# Altium PCB DIO_8SMA_8MCX_MEZZ.PcbDoc (part 2 of 4)
Units mm, origin at the board's own origin, x right, y up, seen from the top; angles counter-clockwise.
Board outline 143 x 98.9 mm, 4 copper layers (Top Layer, Layer 1, Layer 2, Bottom Layer), stack 1.57 mm thick; 303 components, 168 nets, 944 pads, 487 vias.
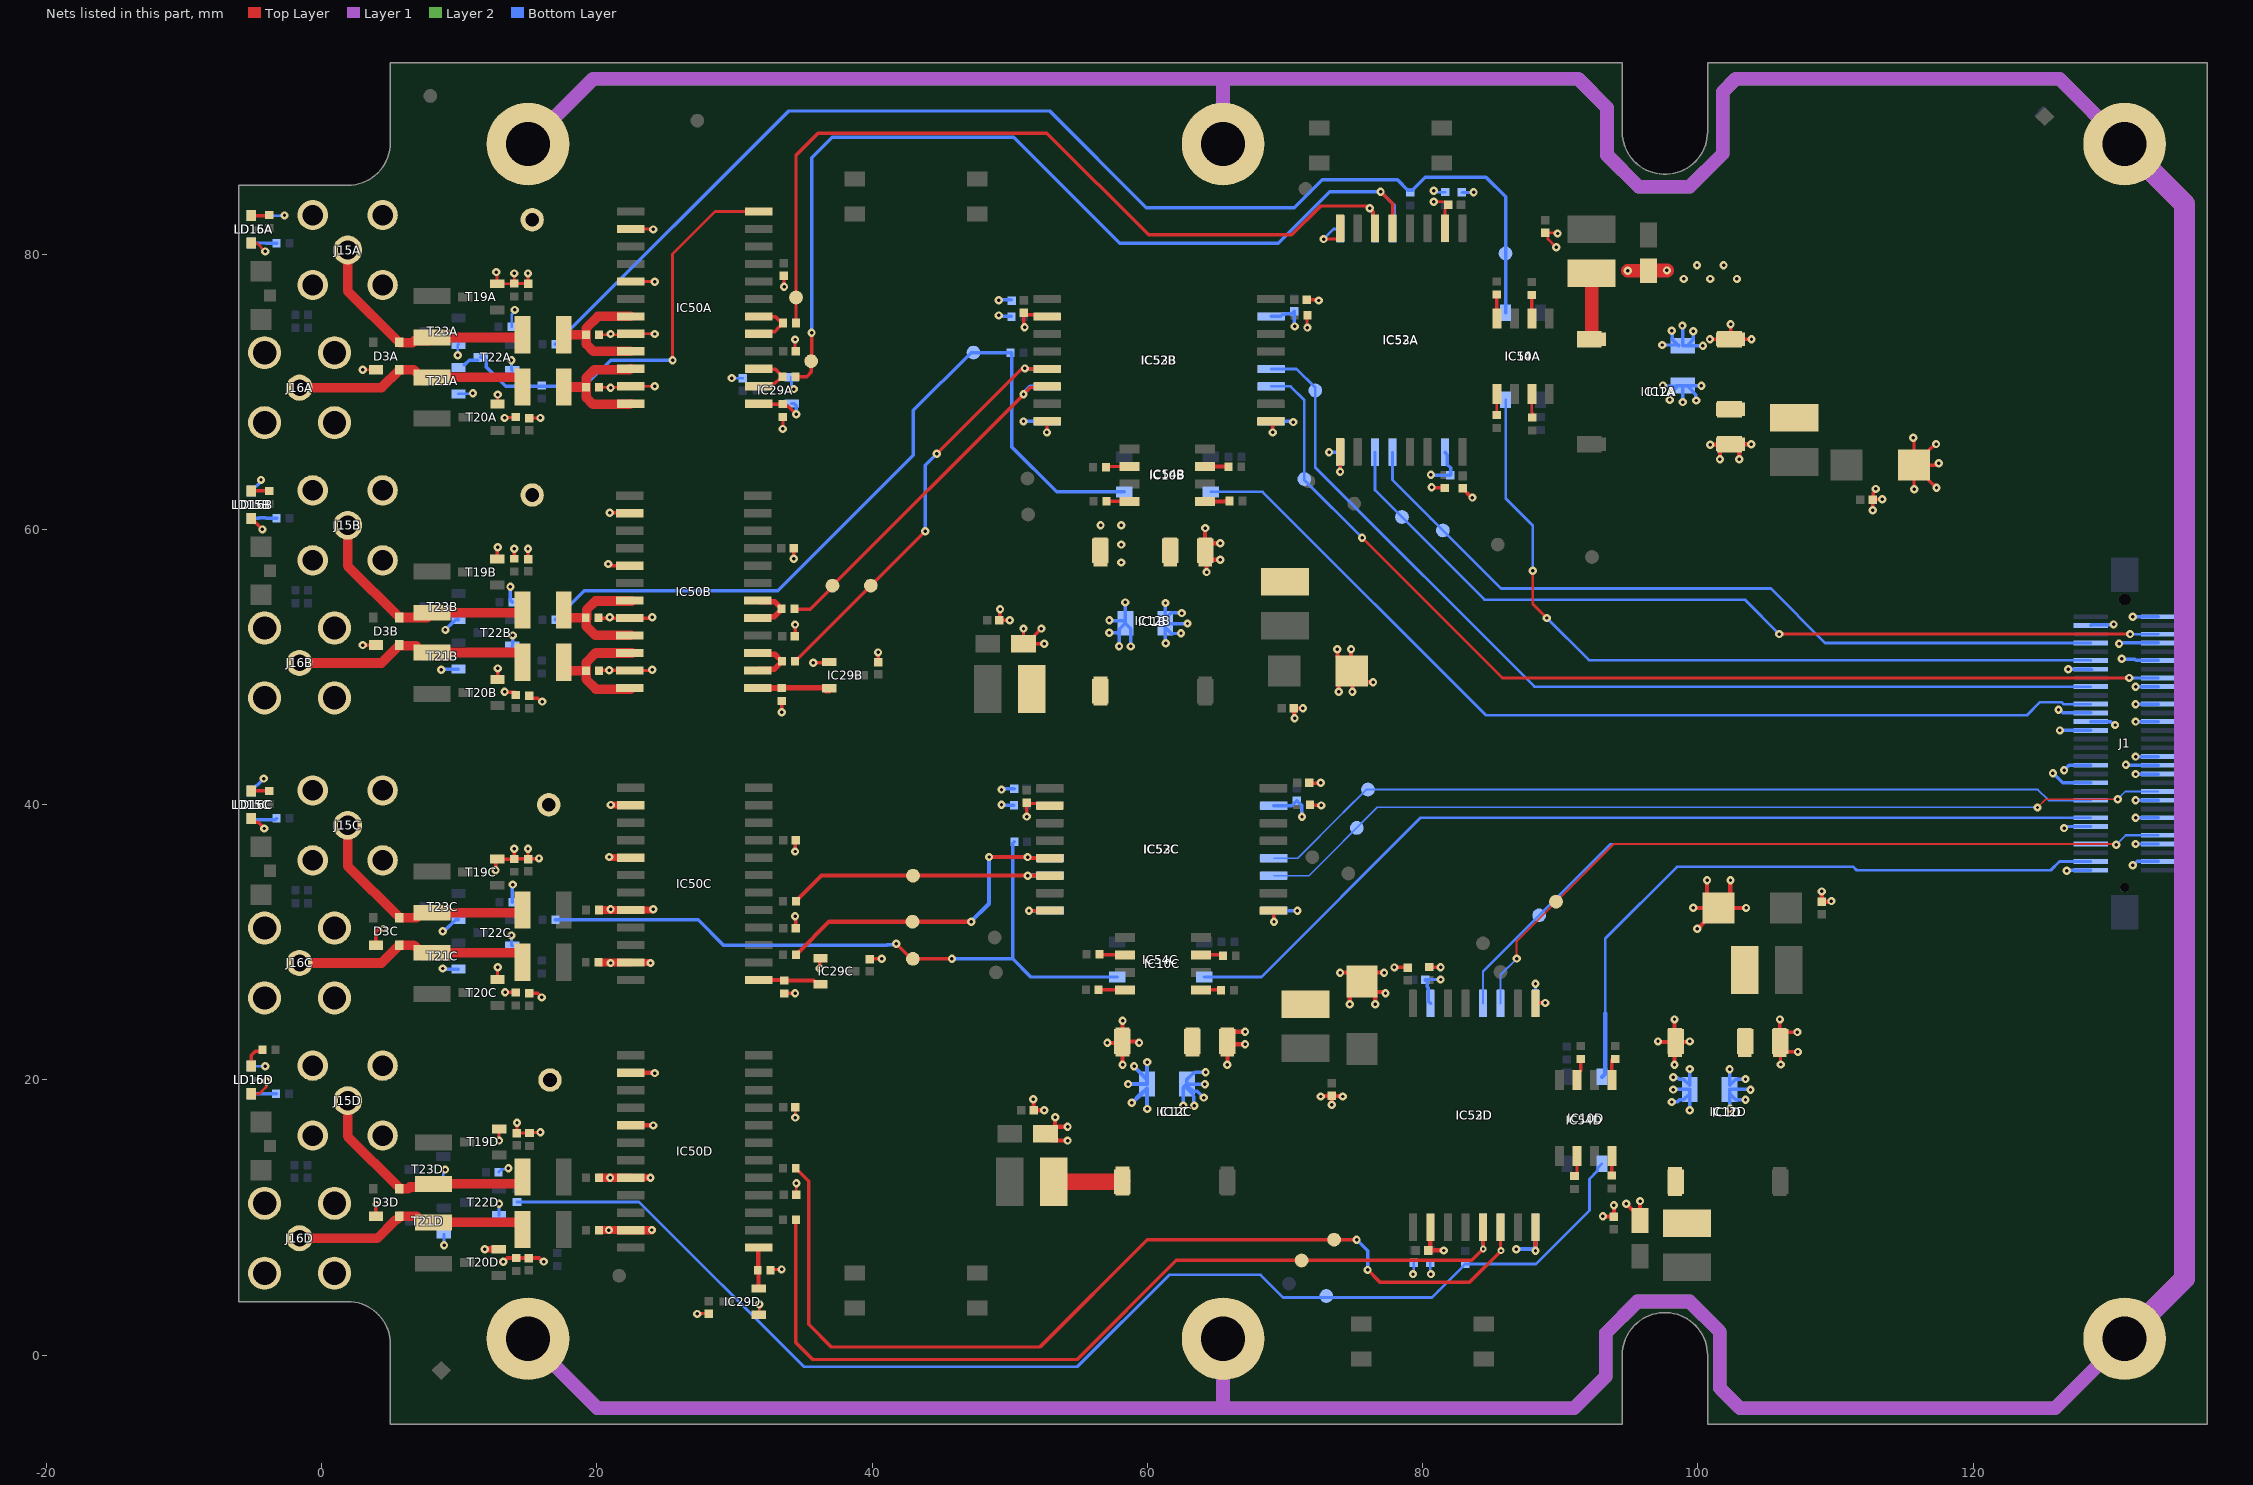
[diagram p4: the nets of this part, all layers, seen from the top]

## Part data
B1A B1B B1C B1D B2A B2B B2C B2D B3A B3B B3C B3D B4A B4B B4C B4D B5A B5B B5C B5D B6A B6B B6C B6D B7A B7B B7C B7D B8A B8B B8C B8D B9A B9B B9C B9D: library part SMD_PAD_D1MM, "Through Hole Pad", Author="CERN DEM JLC", Component Type="Standard (No BOM)", ComponentHeight=0mm, CreateDate=10.10.2017, Family="SMD Pad", HelpURL=Undefined, LatestRevisionDate=10.10.2017, Mounted=No, PackageDescription="1mm Diameter SMD Pad", Part Description="1mm Diameter SMD Pad", Part Number=SMD_PAD_D1MM, Pin Count=1, Sense=No, SMD=No, Socket=No, Status=None
C32A C32B C32C C32D C33A C33B C33C C33D C41A C41B C41C C41D C43A C43B C43C C43D C56A C56B C56C C56D C76A C76B C76C C76D C77A C77B C77C C77D C78A C78B C78C C78D C88A C88B C88C C88D C95A C95B C95C C95D C100A C100B C100C C100D: library part CC0402_100NF_50V_10%_X7R, "Non-polarised capacitor", Case=0402, Manufacturer=GENERIC, Manufacturer1 ComponentHeight=0.55mm, Manufacturer1 Example=MURATA, Manufacturer1 Part Number=GRM155R71H104KE14D, Tolerance=±10%, Voltage=50V, Author="CERN DEM MR", Component Type=Standard, CreateDate=30.06.2017, HelpURL=\\cern.ch\dfs\Applications\Altium\Datasheets\CC0402_MURATA_GRM155R71H104KE14D.pdf, LatestRevisionDate=30.06.2017, Manufacturer Part Number=CC0402_100NF_50V_10%_X7R, Mounted=Yes, Part Description="SMD Multilayer Chip Ceramic Capacitor", Part Number=CC0402_100NF_50V_10%_X7R, Pin Count=2, Sense=No, SMD=Yes, Socket=No, Status=None, TC=X7R
C39A C39B C39C C39D: library part CTE6032-28_1UF_50V_10%, "Polarised capacitor", Case=C, Manufacturer=GENERIC, Manufacturer1 ComponentHeight=2.8mm, Manufacturer1 Example=AVX, Manufacturer1 Part Number=TAJC105K050R, Tolerance=±10%, Voltage=50V, Author="CERN DEM JLC", Component Type=Standard, CreateDate=03.12.2007, HelpURL=\\cern.ch\dfs\Applications\Altium\Datasheets\CTE_AVX_TAJ.pdf, LatestRevisionDate=03.12.2007, Manufacturer Part Number=CTE6032-28_1UF_50V_10%, Mounted=Yes, Part Description="Solid Tantalum Chip Capacitor", Part Number=CTE6032-28_1UF_50V_10%, Pin Count=2, Sense=No, SMD=Yes, Socket=No, Status=Preferred
C42A C42B C42C C42D: library part CTE3216-18_4.7UF_16V_10%_LESR2000, "Polarised capacitor", Case=A, Manufacturer=GENERIC, Manufacturer1 ComponentHeight=1.8mm, Manufacturer1 Example=AVX, Manufacturer1 Part Number=TPSA475K016R2000, Tolerance=±10%, Voltage=16V, Author="CERN DEM JLC", Component Type=Standard, CreateDate=03.09.2012, HelpURL=\\cern.ch\dfs\Applications\Altium\Datasheets\CTE-LESR_AVX_TPS.pdf, LatestRevisionDate=03.09.2012, Manufacturer Part Number=CTE3216-18_4.7UF_16V_10%_LESR2000, Mounted=Yes, Part Description="Low ESR 2R0 Solid Tantalum Chip Capacitor", Part Number=CTE3216-18_4.7UF_16V_10%_LESR2000, Pin Count=2, Sense=No, SMD=Yes, Socket=No, Status=Preferred
D3A D3B D3C D3D: library part CMP-004-00039-1, "D1213A-02SR Series 400 mW Uni-Directional Surface Mount TVS Diode - SOT-143", Case/Package=SOT-143, Max Operating Temperature=150°C, Min Operating Temperature=-65°C, Mounting Technology="Surface Mount", Pins=4
FTG1 FTG5: library part FIDUCIAL_TARGET_C100-200, "Fiducial Target", Author="CERN DEM JLC", Component Type="Standard (No BOM)", ComponentHeight=0mm, CreateDate=09.02.2010, Family=Fiducial, HelpURL=Undefined, LatestRevisionDate=04.04.2012, Mounted=No, PackageDescription="Round Fiducial Target, Top Layer, 1.0mm, Top Solder 2.0mm, Keepout =2.0mm", Part Description="Round Fiducial Target, Top Layer, 1.0mm, Top Solder 2.0mm, Keepout =2.0mm", Part Number=FIDUCIAL_TARGET_C100-200, Pin Count=1, Sense=No, SMD=Yes, Socket=No, Status=None
FTG2 FTG3 FTG4 FTG6: library part FIDUCIAL_TARGET_S100-200, "Fiducial Target", Author="CERN DEM JLC", Component Type="Standard (No BOM)", ComponentHeight=0mm, CreateDate=09.02.2010, Family=Fiducial, HelpURL=Undefined, LatestRevisionDate=04.04.2012, Mounted=No, PackageDescription="Square Fiducial Target, Top Layer, 1.0mm, Top Solder 2.0mm, Keepout =2.0mm", Part Description="Square Fiducial Target, Top Layer, 1.0mm, Top Solder 2.0mm, Keepout =2.0mm", Part Number=FIDUCIAL_TARGET_S100-200, Pin Count=1, Sense=No, SMD=Yes, Socket=No, Status=None
IC1A IC1B IC1C IC1D: library part CMP-019-00162-2, "Dc-Dc Converter, 5V, 0.2A Rohs Compliant: Yes", Isolation Voltage=3kV, Manufacturer="Wurth Elektronik", Max Supply Voltage=13.2V, Output Current=200mA, Height=7.25mm, Length=13.2mm, Manufacturer Part Search=1769205241, Width=11.4mm
IC10A IC10B IC10C IC10D: "Dual Optocoupler", Case=SOIC8, Manufacturer="ON SEMICONDUCTOR", Author="CERN DEM JLC", Bonding=No, Component Type=Standard, ComponentHeight=3.63mm, CreateDate=03.10.2017, Device=MOCD207M, HelpURL=\\cern.ch\dfs\Applications\Altium\Datasheets\MOCD207M.pdf, LatestRevisionDate=03.10.2017, Manufacturer Part Number=MOCD207M, Mounted=Yes, PackageDescription="SOIC, 1.27mm Pitch; 8 Pin, 3.91mm W X 4.88mm L, IPC Medium Density", Part Description="Dual-Channel Phototransistor Output Optocoupler", Part Number=MOCD207M, Pin Count=8, PressFit=No, Sense=No, SMD=Yes, Socket=No
IC12A IC12B IC12C IC12D: library part CMP-019-00163-2, "1W DC/DC-Converter 'ECONOLINE' SMD 2kV unreg; V. In: 12; V. Out: 05; mA. Out: 200", Case/Package=SMD/SMT, Manufacturer="RECOM Power", Max Operating Temperature=100°C, Max Power Dissipation=1W, Max Supply Voltage=13.2V, Min Operating Temperature=-40°C, Output Voltage=5V, Height=6.7mm, Manufacturer Part Number=R1SE-1205/H2-R, Mounting Technology="Surface Mount"
IC29A IC29B IC29C IC29D: library part VMON_MCP810, "3.075V Microcontroller Supervisory Circuit With Push-Pull Output", Case=SOT23, Manufacturer="MICROCHIP TECHNOLOGY", Author=GK, Bonding=No, Component Type=Standard, ComponentHeight=1.12mm, CreateDate=16.06.2011, Device=MCP810T-315I/TT, HelpURL=\\cern.ch\dfs\Applications\Altium\Datasheets\MCP809T-315I-TT.pdf, LatestRevisionDate=16.06.2011, Manufacturer Part Number=MCP810T-315I/TT, Mounted=Yes, PackageDescription="SOT, 0.95mm, pitch; 3 pin,1.30mm W X 2.92mm L X 1.12mm H body, IPC Medium Density", Part Description="3.075V Microcontroller Supervisory Circuit With Push-Pull Output", Part Number=MCP810T-315I/TT, Pin Count=3, PressFit=No, Sense=No, SMD=Yes, Socket=No
IC50A IC50B IC50C IC50D: "25 Ohms Octal Bus Transceiver With 3-State Outputs", Case=SOIC24, Manufacturer="TEXAS INSTRUMENTS", Author="CERN DEM JLC", Bonding=No, Component Type=Standard, ComponentHeight=2.65mm, CreateDate=03.04.2017, Device=SN74ABTH25245DW, HelpURL=\\cern.ch\dfs\Applications\Altium\Datasheets\SN74ABTH25245DW.pdf, LatestRevisionDate=03.04.2017, Manufacturer Part Number=SN74ABTH25245DW, Mounted=Yes, PackageDescription="SOIC 24, Pitch 1.27mm - Body 7.6x15.6mm, IPC Medium Density", Part Description="25 Ohms Octal Bus Transceiver with 3-State Outputs", Part Number=SN74ABTH25245DW, Pin Count=24, PressFit=No, Sense=No, SMD=Yes, Socket=No
IC52A IC52B IC52C IC52D IC53A IC53B IC53C IC53D: library part CMP-015-00012-2, "Highest isolation rating, dual-channel, 2/0, reinforced digital isolator 16-SOIC -55 to 125", Case/Package=SOIC, Manufacturer="Texas Instruments", Max Operating Temperature=125°C, Max Supply Voltage=5.5V, Min Operating Temperature=-55°C, Min Supply Voltage=2.25V, Manufacturer Part Number=ISO7820DWW, Pins=16
IC54A IC54B IC54C IC54D: "Single Optocoupler", Case=SOIC4, Manufacturer=TOSHIBA, Author="CERN DEM JMW", Bonding=No, Component Type=Standard, ComponentHeight=2.3mm, CreateDate=05.10.2015, Device=TLP183, HelpURL=\\cern.ch\dfs\Applications\Altium\Datasheets\TLP183.pdf, LatestRevisionDate=04.09.2017, Manufacturer Part Number=TLP183, Mounted=Yes, PackageDescription="SOIC, 1.27mm Pitch; 4 Pin, TOSHIBA Case (5mm Creepage)", Part Description="Photocoupler InGaAs Infrared LED & Photo-Transistor", Part Number=TLP183, Pin Count=4, PressFit=No, Sense=No, SMD=Yes, Socket=No
J1: library part CMP-002-04666-1, "Header Connector, PCB Mount, RECEPT, 60 Contacts, PIN, 0.025 Pitch, SURFACE MOUNT Term", Case/Package=Metal, Manufacturer=Molex, Manufacturer Part Number=0550910674, Max Operating Temperature=85°C, Min Operating Temperature=-55°C, Mounting Technology="Surface Mount", Number of Rows=2, Pins=60
J15A J15B J15C J15D: library part CMP-002-04652-5, "SMA connector Delock 65848"
J16A J16B J16C J16D: library part AMPHENOL_919-383J-51A, Manufacturer=AMPHENOL, Manufacturer Part Number=919-383J-51A, Author="CERN DEM BC", Component Type=Standard, ComponentHeight=6mm, CreateDate=31.01.2019, Family=MCX, HelpURL=\\cern.ch\dfs\Applications\Altium\Datasheets\AMPHENOL_919-383J-51A.pdf, LatestRevisionDate=31.01.2019, Mounted=Yes, Part Description="50 Ohm, RF Connector, MCX Right Angle PCB Receptacle Jack", Part Number=AMPHENOL_919-383J-51A, Pin Count=5, PressFit=No, Sense=No, SMD=No, Socket=No, Status=None
L5A L5B L5C L5D L11A L11B L11C L11D: library part IND_10UH_10%_MURATA-PS_8400, "Inductor With Core", Manufacturer="MURATA POWER SOLUTIONS", Manufacturer Part Number=84103C, Power=950mA, Resistance=0.24R, Tolerance=±10%, Author="CERN DEM JLC", Component Type=Standard, ComponentHeight=2.9mm, CreateDate=02.07.2012, HelpURL=\\cern.ch\dfs\Applications\Altium\Datasheets\IND_MURATA-PS_8400.pdf, LatestRevisionDate=02.07.2012, Mounted=Yes, Part Description="Miniature Surface Mount Power Inductor (8400 Serie)", Part Number=IND_10UH_10%_MURATA-PS_8400, Pin Count=2, Sense=No, SMD=Yes, Socket=No, Status=None
LD15A LD15B LD15C LD15D LD16A LD16B LD16C LD16D: library part LED_AVAGO_HSME-C120, "LED Green 1C 2A", Manufacturer="AVAGO TECHNOLOGIES", Manufacturer Part Number=HSME-C120, Author="CERN DEM JMW", Bonding=No, Color=Green, Component Type=Standard, ComponentHeight=0.7mm, ComponentLink1Description="Design Guide", ComponentLink1URL=\\cern.ch\dfs\Applications\Altium\Datasheets\LED_AVAGO_HSME-C110_DESIGN-GUIDE.pdf, CreateDate=22.07.2009, HelpURL=\\cern.ch\dfs\Applications\Altium\Datasheets\LED_AVAGO_HSME-C120.pdf, LatestRevisionDate=20.06.2012, Mounted=Yes, PackageDescription="Green Chip LED, 2-Leads, Body 1.7x1.1mm, Side Emitting Package", Part Description="High Performance Right Angle Chip Green LED", Part Number=LED_AVAGO_HSME-C120, Pin Count=2, PressFit=No, Sense=No, SMD=Yes, Socket=No
LD17A LD17B LD17C LD17D: library part CMP-007-00060-1, "Dual Color LED, Hyper Red/super Bright Green, Water Clear, 2mm", Case/Package=SMD/SMT, Forward Voltage=2.2V, Manufacturer=Kingbright, Max Operating Temperature=85°C, Min Operating Temperature=-40°C, Manufacturer Part Number=APBA3010SURKSGC-F01, Mounting Technology="Surface Mount"
LOGO1: library part CMP-00028-00007-2, "ARTIQ logo to place on the PCB"
Logo2: library part CMP-00028-00009-2, "Placeholder for QR code with PN"
M3 M4 M5 M6 M7 M8: library part CMP-00028-00020-1, "Plated Hole for screw 3mm"
R29A R29B R29C R29D R34A R34B R34C R34D R212A R212B R212C R212D R213A R213B R213C R213D R215A R215B R215C R215D R217A R217B R217C R217D R221A R221B R221C R221D: library part R0402_510R_1%_0.0625W_100PPM, "Resistor - 1%", Case=0402, Manufacturer=GENERIC, Manufacturer1 ComponentHeight=0.4mm, Manufacturer1 Example="YAGEO PHYCOMP", Manufacturer1 Part Number=232270675101L, Power=0.0625W, Tolerance=±1%, Author="CERN DEM JLC", Component Type=Standard, CreateDate=03.12.2007, HelpURL=\\cern.ch\dfs\Applications\Altium\Datasheets\R0402_Phycomp_RC0402.pdf, LatestRevisionDate=17.10.2012, Manufacturer Part Number=R0402_510R_1%_0.0625W_100PPM, Mounted=Yes, Part Description="General Purpose Thick Film Chip Resistor", Part Number=R0402_510R_1%_0.0625W_100PPM, Pin Count=2, Sense=No, SMD=Yes, Socket=No, Status="Not recommended", TC=±100ppm/°C
R69A R69B R69C R69D: library part R1206_0R_JUMPER, "Resistor", Case=1206, Manufacturer=GENERIC, Manufacturer1 ComponentHeight=0.65mm, Manufacturer1 Example="NIC COMPONENT", Manufacturer1 Part Number=NRC12Z0, Author="CERN DEM JLC", Component Type=Standard, CreateDate=03.12.2007, HelpURL=\\cern.ch\dfs\Applications\Altium\Datasheets\R1206_NIC_NRC.pdf, LatestRevisionDate=13.03.2008, Manufacturer Part Number=R1206_0R_JUMPER, Mounted=Yes, Part Description="2A (0.05R Max DC Resistance) Zero Ohm Jumper", Part Number=R1206_0R_JUMPER, Pin Count=2, PressFit=No, Sense=No, SMD=Yes, Socket=No, Status=Preferred
R87A R87B R87C R87D R88A R88B R88C R88D R216A R216B R216C R216D: library part R0402_100R_1%_0.1W_100PPM, "Resistor - 1%", Case=0402, Manufacturer=GENERIC, Manufacturer1 ComponentHeight=0.4mm, Manufacturer1 Example=PANASONIC, Manufacturer1 Part Number=ERJ2RKF1000X, Manufacturer Part Number=R0402_100R_1%_0.1W_100PPM_50V, Power=0.1W, Tolerance=±1%, Voltage=50V, Author="CERN DEM JLC", Component Type=Standard, CreateDate=12.12.2013, HelpURL=\\cern.ch\dfs\Applications\Altium\Datasheets\R0402_PANASONIC_ERJ2RK.pdf, LatestRevisionDate=03.03.2015, Mounted=Yes, Part Description="General Purpose Thick Film Chip Resistor", Part Number=R0402_100R_1%_0.1W_100PPM, Pin Count=2, Sense=No, SMD=Yes, Socket=No, Status="Not recommended", TC=±100ppm/°C
R202A R202B R202C R202D: library part R0402_NO-VALUE, "Resistor", Case=0402, Author="CERN DEM JLC", Component Type=Standard, CreateDate=03.12.2007, HelpURL=Undefined, LatestRevisionDate=13.03.2008, Manufacturer=Undefined, Manufacturer1 ComponentHeight=Undefined, Manufacturer1 Example=Undefined, Manufacturer1 Part Number=Undefined, Manufacturer Part Number=R0402_NO-VALUE, Mounted=No, Part Description="Reserved Footprint For a 0402 (1005) Chip Resistor", Part Number=R0402_NO-VALUE, Pin Count=2, PressFit=No, Sense=No, SMD=Yes, Socket=No, Status=None
R203A R203B R203C R203D R208A R208B R208C R208D: library part R1210_30R_5%_0.5W_200PPM, "Resistor - 5%", Case=1210, Manufacturer=VISHAY, Manufacturer Part Number=CRCW121030R0JNEA, Part Number=R1210_30R_5%_0.5W_200ppm, Power=0.5W, Tolerance=±5%, Author="CERN DEM JMW", Component Type=Standard, ComponentHeight=0.6mm, CreateDate=06.08.2014, HelpURL=\\cern.ch\dfs\Applications\Altium\Datasheets\R1210_VISHAY_CRCW1210.pdf, LatestRevisionDate=06.08.2014, Mounted=Yes, Part Description="Thick Film Chip Resistor", Pin Count=2, PressFit=No, Sense=No, SMD=Yes, Socket=No, Status=None, TC=±200ppm/°C
R204A R204B R204C R204D R205A R205B R205C R205D R222A R222B R222C R222D: library part R0402_22R_1%_0.0625W_100PPM, "Resistor - 1%", Case=0402, Manufacturer=GENERIC, Manufacturer1 ComponentHeight=0.4mm, Manufacturer1 Example="YAGEO PHYCOMP", Manufacturer1 Part Number=232270672209L, Power=0.0625W, Tolerance=±1%, Author="CERN DEM JLC", Component Type=Standard, CreateDate=03.12.2007, HelpURL=\\cern.ch\dfs\Applications\Altium\Datasheets\R0402_Phycomp_RC0402.pdf, LatestRevisionDate=17.10.2012, Manufacturer Part Number=R0402_22R_1%_0.0625W_100PPM, Mounted=Yes, Part Description="General Purpose Thick Film Chip Resistor", Part Number=R0402_22R_1%_0.0625W_100PPM, Pin Count=2, PressFit=No, Sense=No, SMD=Yes, Socket=No, Status="Not Recommended", TC=±100ppm/°C
R206A R206B R206C R206D R210A R210B R210C R210D R218A R218B R218C R218D R219A R219B R219C R219D R220A R220B R220C R220D R223A R223B R223C R223D: library part R0402_10K_1%_0.0625W_100PPM, "Resistor - 1%", Case=0402, Manufacturer=GENERIC, Manufacturer1 ComponentHeight=0.4mm, Manufacturer1 Example="YAGEO PHYCOMP", Manufacturer1 Part Number=232270671003L, Power=0.0625W, Tolerance=±1%, Author="CERN DEM JLC", Component Type=Standard, CreateDate=03.12.2007, HelpURL=\\cern.ch\dfs\Applications\Altium\Datasheets\R0402_Phycomp_RC0402.pdf, LatestRevisionDate=17.10.2012, Manufacturer Part Number=R0402_10K_1%_0.0625W_100PPM, Mounted=Yes, Part Description="General Purpose Thick Film Chip Resistor", Part Number=R0402_10K_1%_0.0625W_100PPM, Pin Count=2, Sense=No, SMD=Yes, Socket=No, Status="Not recommended", TC=±100ppm/°C
R207A R207B R207C R207D R211A R211B R211C R211D: library part R1210_49R9_1%_0.5W_100PPM_VISHAY_CRCW, "Resistor - 1%", Case=1210, Manufacturer="VISHAY DRALORIC", Manufacturer Part Number=CRCW121049R9FKTA, Power=0.5W, Tolerance=±1%, Author="CERN DEM JMW", Component Type=Standard, ComponentHeight=0.6mm, CreateDate=06.08.2014, HelpURL=\\cern.ch\dfs\Applications\Altium\Datasheets\R1210_VISHAY_CRCW1210.pdf, LatestRevisionDate=06.08.2014, Mounted=Yes, Part Description="Thick Film Chip Resistor", Part Number=R1210_49R9_1%_0.5W_100PPM_VISHAY_CRCW, Pin Count=2, Sense=No, SMD=Yes, Socket=No, Status=None, TC=±100ppm/°C
R209A R209B R209C R209D R214A R214B R214C R214D: library part R0402_0R_JUMPER, "Resistor", Case=0402, Manufacturer=GENERIC, Manufacturer1 ComponentHeight=0.4mm, Manufacturer1 Example="YAGEO PHYCOMP", Manufacturer1 Part Number=232270591001L, Author="CERN DEM JLC", Component Type=Standard, CreateDate=03.12.2007, HelpURL=\\cern.ch\dfs\Applications\Altium\Datasheets\R0402_Phycomp_RC0402.pdf, LatestRevisionDate=17.10.2012, Manufacturer Part Number=R0402_0R_JUMPER, Mounted=Yes, Part Description="1A (0.05R Max DC Resistance) Zero Ohm Jumper", Part Number=R0402_0R_JUMPER, Pin Count=2, PressFit=No, Sense=No, SMD=Yes, Socket=No, Status="Not Recommended"
SW5A SW5B SW5C SW5D: library part SW_OMRON_A6S-2102-H, "2 Ways SPST DIP Switch", Manufacturer=OMRON, Manufacturer Part Number=A6S-2102-H, Author="CERN DEM JMW", Component Type=Standard, ComponentHeight=3.8mm, CreateDate=25.09.2008, Family=Switch, HelpURL=\\cern.ch\dfs\Applications\Altium\Datasheets\SW_OMRON_A6S-2102-H.pdf, LatestRevisionDate=25.09.2008, Mounted=Yes, PackageDescription="Pitch 2.54mm, Body 6.2x6.4mm, 2 Ways SPST Surface-Mounting DIP Switch, OMRON A6S-H", Part Description="2 Ways SPST DIP Switch, White Flat Actuator with Seal Tape, Contact Rating 25mA 24VDC", Part Number=SW_OMRON_A6S-2102-H, Pin Count=4, PressFit=No, Sense=No, SMD=Yes, Socket=No, Status=None
T19A T19B T19C T19D T20A T20B T20C T20D T21A T21B T21C T21D T22A T22B T22C T22D T23A T23B T23C T23D: "N-CHANNEL MOSFET WITH DIODE", Case=SOT23-3, Manufacturer="ON SEMICONDUCTOR", Author="CERN DEM JLC", Bonding=No, Component Type=Standard, ComponentHeight=1.11mm, CreateDate=23.03.2009, Device=BSS138LT1G, HelpURL=\\cern.ch\dfs\Applications\Altium\Datasheets\BSS138LT1G.pdf, LatestRevisionDate=23.03.2009, Manufacturer Part Number=BSS138LT1G, Mounted=Yes, PackageDescription="SOT23 3-Leads, Pitch 0.95mm - Body 1.4x3mm, IPC Medium Density", Part Description="50V 200mA N-Channel Enhancement Mode Field-Effect Transistor", Part Number=BSS138LT1G, Pin Count=3, PressFit=No, Sense=No, SMD=Yes, Socket=No
TP1A TP1B TP1C TP1D: library part PLATED_HOLE1.0_PAD1.5, "Single Terminal Socket", Author="CERN DEM JLC", Component Type="Standard (No BOM)", ComponentHeight=0mm, CreateDate=30/10/2008, Family="Plated Hole", HelpURL=Undefined, LatestRevisionDate=30/10/2008, Mounted=No, PackageDescription="Plated Through Hole: Hole Dia.=1mm Pad Dia.=1.5mm,  IPC-7251 Level C", Part Description="Plated Through Hole: Hole Dia.=1mm Pad Dia.=1.5mm,  IPC-7251 Level C", Part Number=PLATED_HOLE1.0_PAD1.5, Pin Count=1, Sense=No, SMD=No, Socket=No, Status=None

## Via types
v1: diameter 0.6, hole 0.25, Top Layer to Bottom Layer, tented both sides, 472 vias
v2: diameter 0.5, hole 0.25, Top Layer to Bottom Layer, tented both sides, 8 vias
v3: diameter 0.5, hole 0.2, Top Layer to Bottom Layer, tented both sides, 7 vias

## Nets (pads, with @x,y where several pads share a name; then routed paths per layer and width w, separated by ;. In a path a pad name is that pad's centre, name@x,y a point inside that pad or via, vN(x,y) a via of type N, cw(c..) or ccw(c..) an arc to the next point about the centre after c; other vN are vias at no path point)
CHASSIS: M3.1 M4.1 M5.1 M6.1 M7.1 M8.1 | length 633.8
  Layer 1 w1: M6.1@15,1.2 20.05,-3.85 65.5,-3.85 ; M7.1@15,88 19.75,92.75 65.5,92.75 ; M8.1@65.5,1.2 65.5,-3.85 ; M4.1@65.5,88 65.5,92.75 ; M3.1@131,1.2 125.95,-3.85 103.067,-3.85 101.584,-2.367 101.584,1.716 99.4,3.9 95.6,3.9 93.3,1.6 93.3,-1.542 90.992,-3.85 65.5,-3.85 ; M5.1@131,88 126.25,92.75 102.767,92.75 101.8,91.783 101.8,87.3 99.4,84.9 95.7,84.9 93.4,87.2 93.4,90.642 91.292,92.75 65.5,92.75
  Layer 1 w1.5: M3.1@131,1.2 135.35,5.55 135.35,83.65 M5.1@131,88
  Layer 2 w1: M6.1@15,1.2 20.05,-3.85 65.5,-3.85 ; M7.1@15,88 19.75,92.75 65.5,92.75 ; M8.1@65.5,1.2 65.5,-3.85 ; M4.1@65.5,88 65.5,92.75 ; M3.1@131,1.2 125.95,-3.85 103.067,-3.85 101.584,-2.367 101.584,1.716 99.4,3.9 95.6,3.9 93.3,1.6 93.3,-1.542 90.992,-3.85 65.5,-3.85 ; M5.1@131,88 126.25,92.75 102.767,92.75 101.8,91.783 101.8,87.3 99.4,84.9 95.7,84.9 93.4,87.2 93.4,90.642 91.292,92.75 65.5,92.75
DIR_CTRL5: IC54A.3 J1.11 | length 57.9
  Top Layer w0.2: v1(88,57) 88,54.582 v1(89.018,53.564)
  Bottom Layer w0.2: IC54A.3@86.038,69.426 86.038,62.24 88,60.278 v1(88,57) ; v1(89.018,53.564) 92.082,50.5 128.532,50.5 J1.11@128.55,50.482
DIR_CTRL6: IC54B.3 J1.21 | length 71.1
  Bottom Layer w0.2: IC54B.3@64.618,62.73 68.37,62.73 84.6,46.5 123.9,46.5 124.85,47.45 126.428,47.45 126.57,47.307 J1.21@128.55,47.307
DIR_CTRL7: IC54C.3 J1.47 | length 69.2
  Bottom Layer w0.2: IC54C.3@64.118,27.48 68.28,27.48 79.852,39.052 J1.47@128.55,39.052
DIR_CTRL8: IC54D.3 J1.57 | length 48
  Bottom Layer w0.2: 93.27,24.83 93.27,30.27 98.486,35.486 111.291,35.486 111.541,35.237 125.637,35.237 126.277,35.877 J1.57@128.55,35.877
  Bottom Layer w0.3: IC54D.3@93.02,20.218 93.27,20.468 93.27,24.83
GND: C39A.2 C39B.2 C39C.2 C39D.2 C41A.1 C41B.1 C41C.1 C41D.1 C77A.1 C77B.1 C77C.1 C77D.1 C78A.1 C78B.1 C78C.1 C78D.1 IC1A.1 IC1B.1 IC1C.1 IC1D.1 IC12A.1 IC12B.1 IC12C.1 IC12D.1 IC52A.9 IC52B.9 IC52C.9 IC52D.9 IC53A.2 IC53A.8 IC53B.2 IC53B.8 IC53C.2 IC53C.8 IC53D.2 IC53D.8 J1.2 J1.3 J1.8 J1.12 J1.13 J1.18 J1.22 J1.23 J1.25 J1.26 J1.27 J1.34 J1.35 J1.36 J1.38 J1.39 J1.44 J1.48 J1.49 J1.54 J1.58 J1.59 R69A.1 R69B.1 R69C.1 R69D.1 R209A.2 R209B.2 R209C.2 R209D.2 | length 168.3
  Top Layer w0.25: IC52B.9@68.958,67.855 69.1,67.713 v1(69.1,67.05) ; IC52C.9@69.158,32.305 69.171,32.293 69.171,31.529 v1(69.2,31.5) ; C77B.1@71.583,76.7 71.608,76.675 72.416,76.675 v1(72.456,76.635) ; R209B.2@71.597,75.492 71.598,75.49 71.598,74.696 v1(71.627,74.668) ; C77C.1@71.802,41.561 v1@72.569,41.561 ; R209C.2@71.818,39.963 72.622,39.963 v1(72.638,39.947) ; v1(74,64.2) 74.003,64.203 74.003,65.639 IC52A.9@74.005,65.642 ; v1@77.954,28.183 C77D.1@78.981,28.183 ; 78.32,28.18 78.322,28.183 ; R209D.2@80.558,28.197 80.56,28.198 81.298,28.198 v1(81.3,28.2) ; v1(80.647,63.066) 80.691,63.023 81.622,63.023 R209A.2@81.641,63.003 ; C77A.1@82.85,63.017 83.549,62.318 v1(83.619,62.318) ; IC52D.9@88.195,25.558 88.236,25.6 v1(88.9,25.6) ; v1(105.958,24.399) 105.949,24.389 IC1D.1@105.949,23.104 ; IC1D.1@106,22.411 IC1D.1@106,22.36 ; v1(106.025,21.127) 106,21.152 IC1D.1@106,22.36 ; v1(107.229,23.479) 106.324,23.479 IC1D.1@105.949,23.104 ; v1(107.267,22.036) 106.324,22.036 IC1D.1@106,22.36 ; v1(112.7,61.4) C41A.1@112.699,62.17 C41A.1@112.714,62.185 ; v1(112.922,62.945) 112.922,62.85 112.725,62.653 112.725,62.196 C41A.1@112.714,62.185 ; v1(113.4,62.2) 113.385,62.185 C41A.1@112.714,62.185 ; v1(115.643,66.67) 115.699,66.614 C39A.2@115.699,64.67 ; v1(115.724,62.92) 115.699,62.945 C39A.2@115.699,64.67 ; v1(117.3,66.2) 117.229,66.2 116.749,65.72 116.749,65.67 C39A.2@115.749,64.67 ; v1(117.334,63.027) 117.334,63.035 116.749,63.62 116.749,63.67 C39A.2@115.749,64.67 ; v1(117.5,64.8) 117.405,64.8 117.275,64.67 C39A.2@115.749,64.67 ; IC1D.1@105.949,23.104 IC1D.1@105.949,22.711 105.949,22.411 IC1D.1@106,22.36 ; C39A.2@115.699,64.67 C39A.2@115.749,64.67
  Top Layer w0.3: v1(64.2,60.1) 64.2,58.46 IC12B.1@64.21,58.45 ; IC1B.1@64.21,58.55 64.66,59 v1(65.3,59) ; v1(64.3,56.9) IC1B.1@64.3,58.16 ; v1(65.3,57.8) 64.66,57.8 IC1B.1@64.3,58.16 ; v1(65.8,21.1) 65.81,21.11 IC1C.1@65.81,22.75 65.96,22.6 v1(67.1,22.6) ; IC1C.1@65.81,23.15 66.16,23.5 v1(67.1,23.5) ; v1(70.693,46.281) 70.671,46.302 70.671,46.979 C41B.1@70.65,47 v1(71.3,47) ; v1(72.6,18.8) 72.625,18.825 73.375,18.825 C41C.1@73.4,18.85 ; v1(73.4,18.2) C41C.1@73.4,18.85 ; v1(73.8,51.3) 73.811,51.289 73.811,50.739 73.825,50.725 73.825,50.675 74.8,49.7 C39B.2@74.85,49.7 ; v1(73.9,48.2) 73.9,48.75 C39B.2@74.85,49.7 ; v1(74,27.8) 74.95,27.8 C39C.2@75.6,27.15 ; v1(74.2,18.8) 74.175,18.825 73.425,18.825 C41C.1@73.4,18.85 ; v1(74.7,25.5) 74.7,26.25 C39C.2@75.6,27.15 ; v1(74.8,51.3) 74.8,49.75 C39B.2@74.85,49.7 ; v1(74.9,48.2) C39B.2@74.9,49.65 ; v1(76.4,48.9) 75.65,48.9 C39B.2@74.9,49.65 ; v1(76.559,25.495) 76.559,26.191 76.361,26.389 77.13,26.389 77.219,26.3 v1(77.3,26.3) ; v1(77.2,27.8) 76.25,27.8 C39C.2@75.6,27.15 ; v1@99.65,32.5 C39D.2@101.45,32.5 ; v1(99.958,30.987) 99.987,30.987 100.475,31.475 100.475,31.525 C39D.2@101.45,32.5 ; v1@100.65,34.5 100.65,33.35 C39D.2@101.5,32.5 ; v1(100.888,66.152) IC1A.1@102.011,66.152 ; v1(101.6,65.1) 101.6,65.74 IC1A.1@102.012,66.152 ; IC1A.1@102.05,66.114 IC1A.1@102.012,66.152 ; IC12A.1@102.3,66.19 102.05,66.19 IC1A.1@102.012,66.152 ; v1@102.35,34.5 102.35,33.35 C39D.2@101.5,32.5 ; v1(103,65.1) 103,65.74 102.55,66.19 103.878,66.19 v1(103.879,66.191) ; v1(103.5,32.5) C39D.2@101.5,32.5 ; v1(109,33.7) C41D.1@109,32.95 109.65,32.95 v1(109.7,33) ; IC12B.1@64.21,58.45 64.3,58.36 IC1B.1@64.3,58.16 ; IC12B.1@64.21,58.45 IC1B.1@64.21,58.35 64.21,58.25 IC1B.1@64.3,58.16 ; C39B.2@74.85,49.7 C39B.2@74.9,49.65 ; C39D.2@101.45,32.5 C39D.2@101.5,32.5
  Bottom Layer w0.25: R69B.1@61.299,52.889 61.749,52.439 62.427,52.439 v1(62.441,52.452) ; R69B.1@61.299,53.191 61.301,53.189 61.301,51.76 v1(61.328,51.733) ; v1(61.315,54.657) 61.299,54.641 61.299,53.494 61.749,53.944 62.482,53.944 v1(62.502,53.924) ; R69B.1@61.339,53.15 62.902,53.15 v1(62.916,53.164) ; v1(62.614,18.12) 62.614,19.452 R69C.1@62.875,19.713 ; R69C.1@62.875,19.388 63.325,18.938 63.325,18.829 63.362,18.792 63.362,18.171 v1(63.401,18.132) ; v1(64.088,18.722) 63.628,19.182 63.325,19.182 62.875,19.632 R69C.1@62.875,19.713 ; v1(64.183,19.683) 62.904,19.683 R69C.1@62.875,19.713 ; v1(64.225,20.566) 63.471,20.566 63.393,20.488 63.325,20.488 62.875,20.038 R69C.1@62.875,19.713 ; IC53B.8@68.992,67.855 70.545,67.855 v1(70.6,67.8) ; IC53B.2@68.992,75.475 69.692,75.475 69.867,75.65 69.99,75.65 70.014,75.674 70.491,75.674 C78B.1@70.667,75.85 70.667,74.783 v1(70.7,74.75) ; IC53C.8@69.192,32.305 69.198,32.3 v1(70.9,32.3) ; IC53C.2@69.192,39.925 70.492,39.925 C78C.1@70.867,40.3 71.2,39.968 71.2,39.153 v1(71.234,39.118) ; v1(73.2,65.6) 73.998,65.6 IC53A.8@74.005,65.608 ; IC53D.2@80.575,25.558 80.407,25.726 80.407,26.693 80.341,26.759 80.341,27.126 C78D.1@80.2,27.267 80.232,27.3 v1(81.3,27.3) ; v1(80.603,63.965) 80.616,63.953 82.02,63.953 82.038,63.97 82.038,64.471 81.8,64.709 81.8,65.433 IC53A.2@81.625,65.608 ; IC53D.8@88.195,25.558 88.197,25.561 88.197,26.997 v1(88.2,27) ; v1(97.455,70.463) 97.494,70.424 R69A.1@98.597,70.424 ; v1(97.956,69.408) 97.965,69.416 97.965,69.854 98.111,70 98.125,70 98.476,70.351 98.476,70.45 R69A.1@98.9,70.45 ; v1(98.895,69.251) 98.9,69.256 R69A.1@98.9,70.45 ; v1(99.874,69.367) 99.852,69.389 99.852,69.8 99.675,69.978 99.675,70 99.225,70.45 R69A.1@99.203,70.45 ; v1(100.253,70.437) 99.215,70.437 R69A.1@99.203,70.45 ; v1(102.299,20.788) 102.301,20.785 102.301,19.618 102.751,20.068 103.456,20.068 v1(103.458,20.066) ; v1(102.327,17.904) 102.301,17.93 R69D.1@102.301,19.012 ; v1(103.458,18.56) 103.455,18.562 102.751,18.562 R69D.1@102.301,19.012 ; v1(103.819,19.282) 103.786,19.315 R69D.1@102.301,19.315 R69D.1@102.301,19.012 ; v1(125.791,42.282) 125.818,42.282 126.507,41.593 J1.39@128.55,41.593 ; v1(126.2,46.9) 126.294,46.9 126.521,46.672 J1.23@128.55,46.672 ; v1(126.3,45.4) 126.302,45.402 J1.27@128.55,45.402 ; v1(126.6,38.3) 126.695,38.3 126.812,38.417 J1.49@128.55,38.417 ; v1(126.6,42.5) 126.963,42.862 J1.35@128.55,42.862 ; v1(126.8,35.2) 126.842,35.242 J1.59@128.55,35.242 ; v1(126.9,49.847) J1.13@128.55,49.847 J1.13@128.6,49.798 ; J1.25@128.55,46.038 128.566,46.022 129.99,46.022 130.219,45.793 v1(130.311,45.793) ; J1.3@128.55,53.023 128.587,53.06 130.16,53.06 v1(130.197,53.097) ; v1(130.6,51.7) 130.652,51.752 J1.8@133.45,51.752 ; v1(130.8,50.6) 130.825,50.575 131.738,50.575 131.831,50.482 J1.12@133.45,50.482 ; v1(131.1,42.9) 131.119,42.881 133.431,42.881 J1.36@133.45,42.862 ; v1(131.593,53.655) 131.596,53.657 J1.2@133.45,53.657 ; v1(131.6,35.6) 131.631,35.6 131.908,35.877 J1.58@133.45,35.877 ; v1(131.8,37.148) J1.54@133.45,37.148 ; v1(131.8,39.052) J1.48@133.45,39.052 ; v1(131.8,40.322) J1.44@133.45,40.322 ; v1(131.8,42.227) J1.38@133.45,42.227 ; v1(131.8,43.497) J1.34@133.45,43.497 ; v1(131.8,46.038) J1.26@133.45,46.038 ; v1(131.8,47.307) J1.22@133.45,47.307 ; v1(131.8,48.578) J1.18@133.45,48.578 ; R69A.1@98.9,70.45 R69A.1@99.203,70.45
  other v1: 77.952,28.18 99.666,32.509 100.666,34.509 102.366,34.509 72.6,41.592
GND_ISOA: C32A.1 C33A.1 C42A.2 C43A.1 C56A.1 C76A.1 C88A.1 C95A.1 C100A.1 D3A.1 IC1A.4 IC12A.4 IC29A.1 IC50A.2 IC50A.5 IC50A.8 IC50A.11 IC52A.2 IC52A.8 IC53A.9 J15A.2 J16A.2 LD15A.1 LD16A.1 R69A.2 R202A.1 R206A.1 R210A.1 R214A.1 R218A.2 R219A.2 R223A.1 T19A.2 T20A.2 T21A.2 T22A.2 T23A.2 TP1A.1 | length 55.3
  Top Layer w0.2: LD16A.1@-5.1,80.8 -4.7,80.8 v1(-4.1,80.2) ; v1(3,71.6) D3A.1@3.95,71.6 ; v1(12.7,78.7) 12.75,78.65 T19A.2@12.75,77.85 13.98,77.85 R219A.2@14,77.87 ; T20A.2@12.783,69.1 12.8,69.118 v1(12.8,69.8) ; v1(13.3,68.1) 13.327,68.127 14.072,68.127 R218A.2@14.099,68.154 ; v1(14,78.6) R219A.2@14,77.87 ; v1(15,78.6) C95A.1@15,77.85 14.98,77.87 R219A.2@14,77.87 ; C100A.1@15.093,68.096 15.896,68.096 v1(15.9,68.1) ; R210A.1@20.17,70.335 22.385,70.335 IC50A.11@22.45,70.4 v1(24.2,70.4) ; R206A.1@20.17,74.145 22.385,74.145 IC50A.8@22.45,74.21 24.19,74.21 v1(24.2,74.2) ; IC50A.5@22.45,78.02 24.18,78.02 v1(24.2,78) ; IC50A.2@22.45,81.83 24.07,81.83 v1(24.1,81.8) ; v1(33.5,67.3) 33.518,67.318 R202A.1@33.518,68.169 ; v1(33.605,77.627) C32A.1@33.605,78.404 ; C33A.1@34.4,73 v1(34.4,73.8) ; v1(72.8,81.1) 73.805,81.1 74.005,81.3 IC52A.8@74.005,81.892 ; v1(80.8,83.8) 81.573,83.8 81.596,83.777 81.69,83.777 81.9,83.567 81.625,83.292 IC52A.2@81.625,81.892 ; v1(89.7,80.5) 89.097,81.103 89.097,81.353 C43A.1@88.9,81.55 89.75,81.55 v1(89.8,81.5)
  Top Layer w0.25: v1(100.87,73.822) IC1A.4@102.042,73.822 ; IC1A.4@102.374,73.736 IC12A.4@102.3,73.81 IC1A.4@102.307,73.817 ; v1(102.374,74.912) 102.374,73.884 IC1A.4@102.307,73.817 ; v1(103.892,73.817) IC1A.4@102.307,73.817
  Top Layer w1: v1(94.9,78.8) C42A.2@96.4,78.8 96.419,78.819 v1(97.745,78.819)
  Bottom Layer w0.2: LD15A.1@-5.1,82.8 -2.707,82.8 v1(-2.691,82.816) ; v1(9.887,72.663) 9.887,73.387 T23A.2@9.95,73.45 ; T21A.2@9.95,69.85 10.95,69.85 v1(11,69.9) ; v1(13.8,72.3) 13.8,71.6 T22A.2@13.85,71.55 ; R223A.1@13.826,74.744 13.826,75.633 14.039,75.846 v1(14.039,75.95) ; v1(29.8,71) 29.809,70.991 C56A.1@30.591,70.991 ; IC29A.1@34.15,71.05 34.15,70.458 34.3,70.308 v1(34.3,70.2) ; v1@72.714,81.014 v1(72.8,81.1) 73.522,81.822 73.97,81.822 IC53A.9@74.005,81.858 ; v1(80.8,84.6) 80.908,84.6 81.006,84.503 R214A.1@81.65,84.503 ; C88A.1@82.85,84.483 83.683,84.483 v1(83.7,84.5)
  Bottom Layer w0.25: v1(97.4,73.4) R69A.2@98.547,73.4 ; v1(98.091,74.444) 98.147,74.387 98.147,73.8 R69A.2@98.547,73.4 ; R69A.2@98.597,73.35 R69A.2@98.547,73.4 ; R69A.2@98.597,73.4 R69A.2@98.547,73.4 ; v1(98.875,74.814) 98.9,74.789 R69A.2@98.9,73.35 R69A.2@99.225,73.35 ; v1(99.666,74.405) 99.685,74.387 99.685,74.19 99.675,74.18 99.675,73.8 R69A.2@99.225,73.35 ; v1(100.366,73.342) 100.358,73.35 R69A.2@99.225,73.35
  other v1: 21,70.3 21,74.2 98.967,78.2 100.9,78.2 102.833,78.2 99.933,79.2 101.867,79.2
GND_ISOB: C32B.1 C33B.1 C42B.2 C43B.1 C56B.1 C76B.1 C88B.1 C95B.1 C100B.1 D3B.1 IC1B.4 IC12B.4 IC29B.1 IC50B.2 IC50B.5 IC50B.8 IC50B.11 IC52B.2 IC52B.8 IC53B.9 J15B.2 J16B.2 LD15B.1 LD16B.1 R69B.2 R202B.1 R206B.1 R210B.1 R214B.1 R218B.2 R219B.2 R223B.1 T19B.2 T20B.2 T21B.2 T22B.2 T23B.2 TP1B.1 | length 48.7
  Top Layer w0.25: LD16B.1@-5.1,60.8 v1(-4.3,60) ; v1(3,51.6) D3B.1@3.95,51.6 ; T19B.2@12.75,57.85 T19B.2@12.75,57.85 12.751,58.651 v1(12.8,58.7) ; T20B.2@12.783,49.1 12.8,49.118 v1(12.8,49.9) ; v1(13.3,48.2) 13.323,48.177 14.076,48.177 R218B.2@14.099,48.154 ; R219B.2@14,57.87 v1(14,58.6) ; C95B.1@15,57.85 v1(15,58.6) ; C100B.1@15.094,47.911 15.275,47.73 15.719,47.73 15.953,47.496 v1(16.041,47.496) ; R210B.1@20.102,49.751 20.111,49.76 20.885,49.76 20.905,49.78 22.351,49.78 IC50B.11@22.381,49.75 23.966,49.75 v1(24.031,49.815) ; R206B.1@20.101,53.56 IC50B.8@22.381,53.56 23.976,53.56 v1(24.031,53.615) ; v1(20.831,57.487) 20.926,57.487 21.043,57.37 IC50B.5@22.381,57.37 ; v1(20.931,61.215) 20.948,61.197 22.364,61.197 IC50B.2@22.381,61.18 ; v1(33.431,46.715) R202B.1@33.431,47.545 ; v1(34.316,57.871) 34.311,57.876 34.311,58.601 C32B.1@34.316,58.605 ; C33B.1@34.381,52.286 34.406,52.311 v1(34.407,53.086) ; v1(35.731,50.315) 36.831,50.315 IC29B.1@36.881,50.365 ; C56B.1@40.431,50.265 v1(40.431,51.065) ; v1(49.3,54.2) 49.275,54.175 49.275,53.425 C43B.1@49.25,53.4 v1(50,53.4) ; v1(51,52.8) C42B.2@51,51.7 ; v1(51.077,74.681) 51.033,74.725 51.033,75.75 51.173,75.61 52.573,75.61 IC52B.2@52.708,75.475 ; v1(52.3,52.8) 51.775,52.275 51.775,52.2 51.275,51.7 C42B.2@51,51.7 ; v1(52.5,51.7) C42B.2@51,51.7 ; v1(52.7,67.05) 52.708,67.058 IC52B.8@52.708,67.855
  Bottom Layer w0.25: LD15B.1@-5.1,62.8 -4.467,63.433 -4.467,63.533 v1(-4.4,63.6) ; v1(8.7,49.8) 8.75,49.85 T21B.2@9.95,49.85 ; v1(9,52.7) 9.55,53.25 9.75,53.45 T23B.2@9.95,53.45 ; v1(13.725,55.836) 13.725,54.845 R223B.1@13.87,54.7 ; T22B.2@13.85,51.55 13.9,51.6 v1(13.9,52.3) ; v1(49.2,75.55) 49.25,75.5 R214B.1@50.097,75.5 ; v1(49.2,76.65) 49.25,76.7 C88B.1@50.117,76.7 ; v1(51,67.85) 51.005,67.855 IC53B.9@52.742,67.855 ; v1(57.236,52.496) 57.949,52.496 R69B.2@57.949,52.634 ; v1(57.244,53.395) 57.287,53.353 58.237,53.353 R69B.2@58.399,53.191 ; v1(57.943,51.512) 57.968,51.538 57.968,52.583 57.968,52.761 R69B.2@58.399,53.191 ; v1(58.4,54.7) v1(58.4,54.7) R69B.2@58.399,53.191 ; v1(58.8,51.5) 58.8,52.79 R69B.2@58.399,53.191
  other v1: 20.895,49.77 20.931,53.615 58.1,57.6 58.1,58.9 56.6,60.3 58.1,60.3
GND_ISOC: C32C.1 C33C.1 C42C.2 C43C.1 C56C.1 C76C.1 C88C.1 C95C.1 C100C.1 D3C.1 IC1C.4 IC12C.4 IC29C.1 IC50C.2 IC50C.5 IC50C.8 IC50C.11 IC52C.2 IC52C.8 IC53C.9 J15C.2 J16C.2 LD15C.1 LD16C.1 R69C.2 R202C.1 R206C.1 R210C.1 R214C.1 R218C.2 R219C.2 R223C.1 T19C.2 T20C.2 T21C.2 T22C.2 T23C.2 TP1C.1 | length 59.6
  Top Layer w0.25: LD16C.1@-5.1,39 -5.1,38.95 -4.875,38.725 -4.588,38.725 -4.156,38.293 v1(-4.156,38.274) ; D3C.1@3.95,29.8 3.95,30.768 4.149,30.967 4.467,30.967 v3(4.5,31) ; v1(12.646,35.239) 12.655,35.249 12.655,35.955 T19C.2@12.75,36.05 13.98,36.05 R219C.2@14,36.07 ; T20C.2@12.783,27.3 12.783,28.183 v1(12.8,28.2) ; v1(13.333,26.381) 13.346,26.368 14.086,26.368 R218C.2@14.099,26.354 ; v1(14,36.8) R219C.2@14,36.07 ; v1(15,36.8) C95C.1@15,36.05 ; C100C.1@15.093,26.296 15.692,26.296 15.988,26 v1(16,26) ; v1(15.8,36.1) 15.775,36.075 15.025,36.075 C95C.1@15,36.05 ; R202C.1@33.6,26.3 v1(34.4,26.3) ; v1(34.4,31.9) 34.458,31.842 C33C.1@34.458,31.029 ; v1(34.4,36.6) 34.404,36.604 C32C.1@34.404,37.414 ; v1(36.2,28.1) 36.2,28.8 IC29C.1@36.25,28.85 ; C56C.1@39.827,28.788 39.838,28.8 v1(40.7,28.8) ; v1(51.243,39.136) 51.233,39.146 51.233,40.054 51.268,40.089 52.744,40.089 IC52C.2@52.908,39.925 ; v1(51.4,32.3) 51.405,32.305 IC52C.8@52.908,32.305 ; R219C.2@14,36.07 14.98,36.07 C95C.1@15,36.05
  Top Layer w0.3: v1(51.7,18.6) 51.725,18.575 51.725,17.825 C43C.1@51.75,17.8 v1(52.5,17.8) ; v1(53.3,17.3) 53.3,16.575 52.825,16.1 C42C.2@52.6,16.1 ; v1(54.2,15.6) 53.526,15.6 53.501,15.625 53.075,15.625 C42C.2@52.6,16.1 ; v1(54.2,16.6) 53.526,16.6 53.501,16.575 53.075,16.575 C42C.2@52.6,16.1 ; v1(57.1,22.7) 58.09,22.7 IC12C.4@58.19,22.8 ; v1(58.2,21.1) 58.19,21.11 IC12C.4@58.19,22.8 ; v1(58.2,24.3) 58.19,24.29 IC12C.4@58.19,22.8 ; v1(59.4,22.7) 59.319,22.7 59.219,22.8 IC12C.4@58.19,22.8
  Top Layer w0.5: v1(20.9,36.2) 20.927,36.2 20.972,36.155 IC50C.5@22.45,36.155 ; v1(21.013,39.984) 21.025,39.972 22.444,39.972 IC50C.2@22.45,39.965 ; IC50C.11@22.45,28.535 22.458,28.527 23.846,28.527 23.873,28.5 v1(23.9,28.5) ; IC50C.8@22.45,32.345 24.018,32.345 24.073,32.4 v1(24.1,32.4)
  Top Layer w0.6: R206C.1@20.17,32.345 21.75,32.345 IC50C.8@22.45,32.345 ; R210C.1@20.18,28.535 IC50C.11@22.45,28.535
  Bottom Layer w0.25: LD15C.1@-5.1,41 v1(-4.2,41.9) ; v1(8.8,28.1) 8.85,28.05 T21C.2@9.95,28.05 ; v1(8.8,30.8) 8.867,30.867 8.967,30.867 9.75,31.65 T23C.2@9.95,31.65 ; v1(13.8,30.5) 13.8,29.8 T22C.2@13.85,29.75 ; R223C.1@13.87,32.9 13.87,34.17 v1(13.9,34.2) ; v1(49.4,40) 49.45,39.95 R214C.1@50.297,39.95 ; v1(49.4,41.1) 49.45,41.15 C88C.1@50.317,41.15 ; v1(51.4,32.3) 51.405,32.305 IC53C.9@52.942,32.305
  Bottom Layer w0.3: v1(58.6,19.7) 58.613,19.713 R69C.2@59.975,19.713 ; v1(58.856,18.355) 58.908,18.355 59.516,18.963 59.55,18.963 59.975,19.388 59.975,17.925 v1(60,17.9) ; v1(59.036,21.002) 59.036,20.967 59.539,20.463 59.55,20.463 59.975,20.038 R69C.2@59.975,19.713 ; v1(60,21.3) 59.975,21.275 R69C.2@59.975,19.713
  other v1: 21,28.5 21,32.4
GND_ISOD: C32D.1 C33D.1 C42D.2 C43D.1 C56D.1 C76D.1 C88D.1 C95D.1 C100D.1 D3D.1 IC1D.4 IC12D.4 IC29D.1 IC50D.2 IC50D.5 IC50D.8 IC50D.11 IC52D.2 IC52D.8 IC53D.9 J15D.2 J16D.2 LD15D.1 LD16D.1 R69D.2 R202D.1 R206D.1 R210D.1 R214D.1 R218D.2 R219D.2 R223D.1 T19D.2 T20D.2 T21D.2 T22D.2 T23D.2 TP1D.1 | length 56.4
  Top Layer w0.2: LD16D.1@-5.1,19 -4.5,19 -4.024,19.476 -4.024,19.876 v1(-4,19.9) ; T19D.2@12.894,16.45 12.894,15.606 v1(12.9,15.6) ; v1(14.2,16.9) 14.2,16.155 C95D.1@14.187,16.142 15.088,16.142 R219D.2@15.107,16.161 15.127,16.18 15.88,16.18 v1(15.9,16.2) ; v1(27.3,3) 27.328,3.028 C56D.1@28.148,3.028 ; IC29D.1@31.75,2.95 31.8,3 v1(31.8,3.7) ; R202D.1@32.67,6.2 32.705,6.235 v1(33.423,6.235) ; v1(34.424,17.268) 34.424,18.03 C32D.1@34.429,18.035 ; C33D.1@34.483,11.65 34.483,12.483 v1(34.5,12.5)
  Top Layer w0.25: D3D.1@3.95,10.1 3.95,10.966 v3(3.956,10.971)
  Top Layer w0.3: v1(13.2,6.8) 13.25,6.8 13.514,7.064 14.15,7.064 14.154,7.068 15.804,7.068 16.068,6.805 v1(16.149,6.805) ; IC50D.5@22.447,16.711 24.089,16.711 v1(24.1,16.7) ; IC50D.2@22.447,20.521 24.179,20.521 v1(24.2,20.5) ; C76D.1@80.3,7.633 81.505,7.633 v1(81.526,7.613) ; C76D.1@80.416,7.633 80.554,7.771 IC52D.2@80.554,9.287 ; IC52D.8@88.195,9.308 88.195,7.605 v1(88.2,7.6) ; v1(93.1,10.1) 93.125,10.075 93.875,10.075 C43D.1@93.9,10.05 v1(93.9,10.9) ; v1(94.8,11) 95.25,10.55 95.325,10.55 95.8,10.075 C42D.2@95.8,9.8 v1(95.8,11.2) ; v1(97.1,22.8) 97.15,22.75 IC1D.4@98.29,22.75 ; v1(98.3,21.1) 98.29,21.11 IC1D.4@98.29,22.75 ; v1(98.3,24.4) 98.29,24.39 IC1D.4@98.29,22.75 ; v1(99.4,22.8) 99.35,22.75 IC1D.4@98.29,22.75
  Top Layer w0.5: v1(11.848,7.696) 11.852,7.7 T20D.2@12.883,7.7 ; IC50D.8@22.447,12.901 v1(23.9,12.9) v1(23.9,12.9)
  Top Layer w0.6: R210D.1@20.18,9.092 21.57,9.092 IC50D.11@22.447,9.091 ; R206D.1@20.18,12.893 21.739,12.893 21.747,12.901 IC50D.8@22.439,12.901 ; IC50D.11@22.447,9.091 23.991,9.091 v1(24,9.1)
  Bottom Layer w0.2: LD15D.1@-5.1,21 v1(-4.1,21) ; T23D.2@8.85,12.55 8.85,13.258 8.972,13.379 v1(8.972,13.488) ; T21D.2@8.883,8.8 8.891,8.791 8.891,8.009 v1(8.9,8) ; R223D.1@12.87,13.3 12.87,13.32 13.06,13.51 13.503,13.51 v1(13.575,13.582) ; T22D.2@12.892,10.16 12.892,10.992 v1(12.9,11) ; v1(79.3,5.9) 79.35,5.95 C88D.1@79.35,6.717 ; R214D.1@80.55,6.697 80.55,5.95 v1(80.6,5.9)
  Bottom Layer w0.25: v1(98.1,18.4) 98.134,18.434 98.52,18.434 98.649,18.562 98.951,18.562 99.401,19.012 R69D.2@99.401,19.315 ; v1(98.2,19.3) 98.215,19.315 R69D.2@99.401,19.315 ; v1(98.2,20.2) 98.267,20.133 98.583,20.133 98.649,20.068 98.951,20.068 99.401,19.618 99.401,20.799 v1(99.4,20.8) ; v1(99.4,17.8) v1(99.4,17.8) R69D.2@99.401,19.315
  Bottom Layer w0.3: v1(86.8,7.7) 86.833,7.733 88.015,7.733 88.195,7.913 IC53D.9@88.195,9.308
  other v1: 20.875,9.092 20.959,12.893
IN_CH9: B6A.1 IC53A.6 J1.6 | length 64
  Top Layer w0.2: v1(105.9,52.4) v1(131.4,52.4)
  Bottom Layer w0.2: IC53A.6@76.545,65.608 76.545,62.855 84.5,54.9 103.4,54.9 v1(105.9,52.4) ; v1(131.4,52.4) 131.406,52.394 133.444,52.394 J1.6@133.45,52.387
IN_CH10: B5A.1 IC53A.5 J1.7 | length 57.7
  Bottom Layer w0.2: IC53A.5@77.815,65.608 77.815,63.585 80.615,60.785 85.7,55.7 105.3,55.7 109.247,51.752 J1.7@128.55,51.752
IN_CH11: B6B.1 IC53B.6 J1.16 | length 76.6
  Top Layer w0.2: v1(75.6,59.4) 85.791,49.209 v1(131.344,49.209)
  Bottom Layer w0.2: IC53B.6@68.992,70.395 70.405,70.395 71.4,69.4 71.4,63.6 v1(75.6,59.4) ; v1(131.344,49.209) 133.446,49.209 J1.16@133.45,49.212
IN_CH12: B5B.1 IC53B.5 J1.17 | length 72.5
  Bottom Layer w0.2: IC53B.5@68.992,71.665 70.835,71.665 72.2,70.3 72.2,70 72.2,64.5 88.123,48.578 J1.17@128.55,48.578
IN_CH13: B6C.1 IC53C.6 J1.42 | length 66.8
  Top Layer w0.12: v1(124.674,39.797) 125.276,40.4 v1(130.5,40.4)
  Bottom Layer w0.12: IC53C.6@69.192,34.845 71.745,34.845 76.708,39.808 124.663,39.808 v1(124.674,39.797) ; v1(130.5,40.4) 131.058,40.957 J1.42@133.45,40.957
IN_CH14: B5C.1 IC53C.5 J1.43 | length 61.7
  Bottom Layer w0.12: IC53C.5@69.192,36.115 70.915,36.115 74.25,39.45
  Bottom Layer w0.15: 74.25,39.45 75.9,41.1 124.699,41.1 125.477,40.322 J1.43@128.55,40.322
IN_CH15: B6D.1 IC53D.6 J1.52 | length 54.9
  Top Layer w0.15: v1@86.827,28.826 86.827,30.091 B6D.1@89.694,32.958 93.883,37.147 130.353,37.147 v1(130.4,37.1)
  Bottom Layer w0.15: IC53D.6@85.655,25.558 85.655,27.644 v1(86.832,28.821) ; v1(130.4,37.1) 131.083,37.782 J1.52@133.45,37.782
IN_CH16: B5D.1 IC53D.5 J1.53 | length 50.3
  Bottom Layer w0.15: IC53D.5@84.385,25.558 84.385,27.885 93.648,37.148 J1.53@128.55,37.148
IO0A: D3A.3 J15A.1 R203A.1 R207A.2 | length 17.1
  Top Layer w0.7: J15A.1@1.9,80.3 1.9,77.316 D3A.3@5.616,73.6 ; D3A.3@5.675,73.575 6.623,73.575 6.773,73.725 7.808,73.725 R207A.2@8.033,73.95 R203A.1@14.4,73.95
IO0B: D3B.3 J15B.1 R203B.1 R207B.2 | length 17.1
  Top Layer w0.7: J15B.1@1.9,60.3 1.9,57.35 D3B.3@5.65,53.6 7.683,53.6 R207B.2@8.033,53.95 R203B.1@14.4,53.95
IO0C: D3C.3 J15C.1 R203C.1 R207C.2 | length 17.6
  Top Layer w0.7: J15C.1@1.9,38.5 1.9,35.55 D3C.3@5.65,31.8 6.908,31.8 7.258,32.15 R203C.1@14.4,32.15 ; R203C.1@14.6,32.15 R203C.1@14.4,32.15 ; R203C.1@14.6,32.35 R203C.1@14.4,32.15
IO0D: D3D.3 J15D.1 R203D.1 R207D.2 | length 17.3
  Top Layer w0.7: J15D.1@1.9,18.5 1.9,15.9 5.65,12.15 D3D.3@5.65,12.1 ; D3D.3@5.663,12.087 6.286,12.087 6.424,12.225 7.908,12.225 R207D.2@8.133,12.45 14.112,12.45 14.6,12.938 R203D.1@14.6,12.95
IO1A: D3A.2 J16A.1 R208A.1 R211A.2 | length 17.5
  Top Layer w0.7: J16A.1@-1.6,70.3 4.35,70.3 D3A.2@5.65,71.6 6.708,71.6 7.258,71.05 14.375,71.05 14.6,70.825 R208A.1@14.6,70.35
IO1B: D3B.2 J16B.1 R208B.1 R211B.2 | length 16.1
  Top Layer w0.7: J16B.1@-1.6,50.3 4.35,50.3 D3B.2@5.65,51.6 5.713,51.537 6.863,51.537 R211B.2@7.4,51 ; R211B.2@8.039,51.056 R208B.1@14.375,51.056
IO1C: D3C.2 J16C.1 R208C.1 R211C.2 | length 17.5
  Top Layer w0.7: J16C.1@-1.6,28.5 4.35,28.5 D3C.2@5.65,29.8 6.708,29.8 7.258,29.25 R211C.2@8.033,29.25 ; R211C.2@8.039,29.256 14.375,29.256 14.6,29.031 R208C.1@14.6,28.55
IO1D: D3D.2 J16D.1 R208D.1 R211D.2 | length 17.3
  Top Layer w0.7: J16D.1@-1.6,8.5 4.05,8.5 5.387,9.837 5.437,9.837 5.65,10.05 D3D.2@5.65,10.1 6.908,10.1 7.358,9.65 14.112,9.65 14.6,9.163 R208D.1@14.6,9.133
LED0A: LD15A.2 R212A.2 | length 1.8
  Bottom Layer w0.25: LD15A.2@-5.1,80.8 -4.875,80.8 -4.865,80.81 -4.039,80.81 -4.029,80.8 R212A.2@-3.27,80.8
LED0B: LD15B.2 R212B.2 | length 1.9
  Bottom Layer w0.25: LD15B.2@-5.1,60.8 -4.571,60.8 -4.526,60.845 -4.074,60.845 -4.029,60.8 R212B.2@-3.27,60.8
LED0C: LD15C.2 R212C.2 | length 1.9
  Bottom Layer w0.25: LD15C.2@-5.1,39 -5.014,38.914 -3.356,38.914 R212C.2@-3.27,39
LED0D: LD15D.2 R212D.2 | length 1.8
  Bottom Layer w0.25: LD15D.2@-5.1,19 R212D.2@-3.3,19
LED1A: LD16A.2 R213A.2 | length 1.3
  Top Layer w0.25: LD16A.2@-5.1,82.8 -3.836,82.8 R213A.2@-3.806,82.829
LED1B: LD16B.2 R213B.2 | length 1.2
  Top Layer w0.25: LD16B.2@-5.1,62.8 R213B.2@-3.87,62.8
LED1C: LD16C.2 R213C.2 | length 1.3
  Top Layer w0.25: LD16C.2@-5.1,41 -3.87,41 R213C.2@-3.8,41.07
LED1D: LD16D.2 R213D.2 | length 1.8
  Top Layer w0.25: LD16D.2@-5.1,21 -5.1,21.8 -4.8,22.1 R213D.2@-4.27,22.1
LED_OUTA: B7A.1 IC54A.4 R216A.1 R222A.2 | length 89.6
  Bottom Layer w0.25: R222A.2@16.983,73.444 16.983,73.464 17.148,73.629 17.168,73.629 33.939,90.4 52.9,90.4 59.925,83.375 70.675,83.375 72.7,85.4 78.17,85.4 78.915,84.655 78.915,84.635 79.285,84.635 79.285,84.685 80.2,85.6 84.6,85.6 86.024,84.176 B7A.1@86.024,80.056 IC54A.4@86.024,75.74
LED_OUTB: B7B.1 IC54B.4 R216B.1 R222B.2 | length 59.5
  Bottom Layer w0.25: R222B.2@16.983,53.444 16.983,53.464 17.073,53.554 17.093,53.554 19.077,55.538 33.138,55.538 43,65.4 43,68.65 47.2,72.85 50.13,72.85 50.13,66.02 53.42,62.73 IC54B.4@58.318,62.73
LED_OUTC: B7C.1 IC54C.4 R216C.1 R222C.2 | length 51.2
  Top Layer w0.25: v1(41.75,29.89) 42.84,28.8 v1(45.8,28.8)
  Bottom Layer w0.25: R222C.2@16.983,31.644 27.356,31.644 29.2,29.8 41.079,29.8 41.112,29.833 41.694,29.833 v1(41.75,29.89) ; v1(45.8,28.8) 50.213,28.8 ; R216C.1@50.33,37.3 50.213,37.183 50.213,28.8 ; IC54C.4@57.818,27.48 51.532,27.48 50.213,28.8
LED_OUTD: B7D.1 IC54D.4 R216D.1 R222D.2 | length 92.7
  Bottom Layer w0.2: R222D.2@14.2,11.13 23.07,11.13 35.038,-0.838 54.906,-0.838 61.589,5.845 68.219,5.845 69.864,4.2 80.67,4.2 81.148,4.678 82.89,6.42 82.89,6.44 83.08,6.63 88.23,6.63 92.124,10.524 92.124,12.814 92.72,13.409 92.72,13.618 IC54D.4@93.02,13.918
NetB1A_1: B1A.1 IC52A.5 IC53A.12 R204A.2 | length 69.7
  Top Layer w0.25: R204A.2@34.438,71.107 35.256,71.107 35.59,71.441 B1A.1@35.59,72.09 ; B1A.1@35.6,72.1 v1(35.6,74.3) ; v1(76.943,84.54) 77.815,83.668 IC52A.5@77.815,81.892
  Bottom Layer w0.25: v1(35.6,74.3) 35.6,87 37.1,88.5 50.3,88.5 58,80.8 69.5,80.8 73.24,84.54 v1(76.943,84.54) 77.926,83.557 77.926,81.968 IC53A.12@77.815,81.858
NetB1B_1: B1B.1 IC52B.5 IC53B.12 R204B.2 | length 31.6
  Top Layer w0.25: R204B.2@34.401,50.415 B1B.1@39.904,55.917 v1(43.862,59.876) ; v1(44.7,65.5) 50.833,71.633 51.033,71.633 v1(51.1,71.7) 51.135,71.665 IC52B.5@52.708,71.665 IC52B.5@52.712,71.661
  Bottom Layer w0.25: v1(43.862,59.876) 43.862,64.662 v1(44.7,65.5) ; v1(51.1,71.7) 51.135,71.665 IC53B.12@52.742,71.665
NetB1C_1: B1C.1 IC52C.5 IC53C.12 R204C.2 | length 25.3
  Top Layer w0.3: R204C.2@34.47,29.1 34.47,29.12 34.61,29.26 34.643,29.26 36.883,31.5 B1C.1@42.932,31.5 v1(47.198,31.5) v1@47.3,31.5 ; v1(48.5,36.2) 48.501,36.199 v1(51.296,36.199) 51.377,36.199 51.461,36.115 IC52C.5@52.908,36.115 IC52C.5@52.991,36.199
  Bottom Layer w0.3: v1(47.198,31.5) 48.5,32.802 v1(48.5,36.2) ; v1(51.296,36.199) 51.377,36.199 51.461,36.115 IC53C.12@52.942,36.115
NetB1D_1: B1D.1 IC52D.5 IC53D.12 R204D.2 | length 65.9
  Top Layer w0.25: R204D.2@34.455,9.834 34.455,0.927 35.689,-0.307 54.893,-0.307 62.089,6.889 B1D.1@71.205,6.889 83.564,6.889 v3(84.4,7.724) 84.4,9.293 IC52D.5@84.385,9.308
  Bottom Layer w0.25: IC53D.12@84.385,9.308 84.385,7.74 v3(84.4,7.724)
NetB3A_1: B3A.1 IC52A.6 IC53A.11 R205A.2 | length 61.8
  Top Layer w0.25: R205A.2@34.47,75 B3A.1@34.47,76.849 34.47,87.199 36.071,88.8 52.7,88.8 60.1,81.4 70.5,81.4 72.6,83.5 75.905,83.5 76.068,83.337 v1(76.163,83.337) 76.426,83.074 76.426,82.012 IC52A.6@76.545,81.892
  Bottom Layer w0.25: v1(76.163,83.337) 76.163,83.254 76.401,83.016 76.401,82.002 IC53A.11@76.545,81.858
NetB3B_1: B3B.1 IC52B.6 IC53B.11 R205B.2 | length 27.1
  Top Layer w0.25: R205B.2@34.401,54.215 35.515,54.215 B3B.1@37.168,55.868 ; B3B.1@37.119,55.917 v1@50.999,69.797 ; v1@50.999,69.82 51.49,70.311 52.624,70.311 IC52B.6@52.708,70.395
  Bottom Layer w0.25: v1(50.999,69.831) 50.999,69.924 51.471,70.395 IC53B.11@52.742,70.395
NetB3C_1: B3C.1 IC52C.6 IC53C.11 R205C.2 | length 20.8
  Top Layer w0.3: R205C.2@34.47,33 34.47,33.02 34.61,33.16 34.63,33.16 36.315,34.845 IC52C.6@52.908,34.845
  Bottom Layer w0.3: v1(51.311,34.845) IC53C.11@52.942,34.845
NetB3D_1: B3D.1 IC52D.6 IC53D.11 R205D.2 | length 72.4
  Top Layer w0.25: R205D.2@34.452,13.583 34.452,13.563 34.617,13.398 34.637,13.398 35.382,12.654 35.382,2.261 37.043,0.6 52.2,0.6 60,8.4 B3D.1@73.566,8.4 v1(75.2,8.4) ; v1(76,6.2) 76.899,5.301 83.401,5.301 v3(85.7,7.6) ; v3@85.655,7.645 IC52D.6@85.655,9.309
  Bottom Layer w0.25: v1(75.2,8.4) 76,7.6 v1(76,6.2) ; IC53D.11@85.655,9.308 85.655,7.645 v3(85.7,7.6)
NetIC1A_2: IC1A.2 IC12A.2 L11A.1
NetIC1A_5: IC1A.5 IC12A.5 L5A.2 | length 4.9
  Top Layer w1: IC12A.5@92.1,73.81 92.178,73.81 92.278,73.91 L5A.2@92.278,78.6
NetIC1B_2: IC1B.2 IC12B.2 L11B.1
NetIC1B_5: IC1B.5 IC12B.5 L5B.2
NetIC1C_2: IC1C.2 IC12C.2 L11C.1
NetIC1C_5: IC1C.5 IC12C.5 L5C.2 | length 5
  Top Layer w1.2: L5C.2@53.2,12.6 IC12C.5@58.19,12.6
NetIC1D_2: IC1D.2 IC12D.2 L11D.1
NetIC1D_5: IC1D.5 IC12D.5 L5D.2
NetIC10A_1: IC10A.1 R34A.1 | length 1.5
  Top Layer w0.2: IC10A.1@85.389,69.84 85.389,68.382 R34A.1@85.416,68.356
NetIC10A_3: IC10A.3 R29A.1 | length 1.5
  Top Layer w0.2: IC10A.3@87.929,69.84 87.929,68.48 R29A.1@88.039,68.37
NetIC10A_6: IC10A.6 R87A.2 | length 1.5
  Top Layer w0.25: R87A.2@87.92,76.826 87.929,76.816 IC10A.6@87.929,75.34
NetIC10A_8: IC10A.8 R88A.2 | length 1.5
  Top Layer w0.25: IC10A.8@85.389,75.34 85.389,76.815 R88A.2@85.394,76.82
NetIC10B_1: IC10B.1 R34B.1 | length 1.5
  Top Layer w0.3: IC10B.1@64.202,62.042 65.677,62.042 R34B.1@65.682,62.047
NetIC10B_3: IC10B.3 R29B.1 | length 1.5
  Top Layer w0.3: IC10B.3@64.202,64.582 65.663,64.582 R29B.1@65.672,64.592
NetIC10B_6: IC10B.6 R87B.2 | length 1.5
  Top Layer w0.25: R87B.2@57.216,64.572 58.692,64.572 IC10B.6@58.702,64.582
NetIC10B_8: IC10B.8 R88B.2 | length 1.5
  Top Layer w0.25: R88B.2@57.222,62.047 57.227,62.042 IC10B.8@58.702,62.042
NetIC10C_1: IC10C.1 R34C.1 | length 1.5
  Top Layer w0.25: IC10C.1@63.882,26.545 65.357,26.545 R34C.1@65.362,26.55
NetIC10C_3: IC10C.3 R29C.1 | length 1.5
  Top Layer w0.25: IC10C.3@63.882,29.085 65.343,29.085 R29C.1@65.352,29.095
NetIC10C_6: IC10C.6 R87C.2 | length 2
  Top Layer w0.25: R87C.2@56.362,29.085 IC10C.6@58.382,29.085
NetIC10C_8: IC10C.8 R88C.2 | length 1.9
  Top Layer w0.25: R88C.2@56.47,26.5 56.515,26.545 IC10C.8@58.382,26.545
NetIC10D_1: IC10D.1 R34D.1 | length 1.5
  Top Layer w0.25: R34D.1@93.75,21.462 93.75,19.987 IC10D.1@93.755,19.982
NetIC10D_3: IC10D.3 R29D.1 | length 1.7